# Altium PCB Zybo_Z7_Pcb.PcbDoc (part 6 of 8)
Units mm, origin at the board's own origin, x right, y up, seen from the top; angles counter-clockwise.
Board outline 122 x 88 mm, 8 copper layers (Top Layer, Layer 2, Layer 3, Layer 4, Layer 5, Layer 6, Layer 7, Bottom Layer), stack 1.625 mm thick; 658 components, 558 nets, 2538 pads, 924 vias.
Unrouted connection lines stored in the file: 1229.
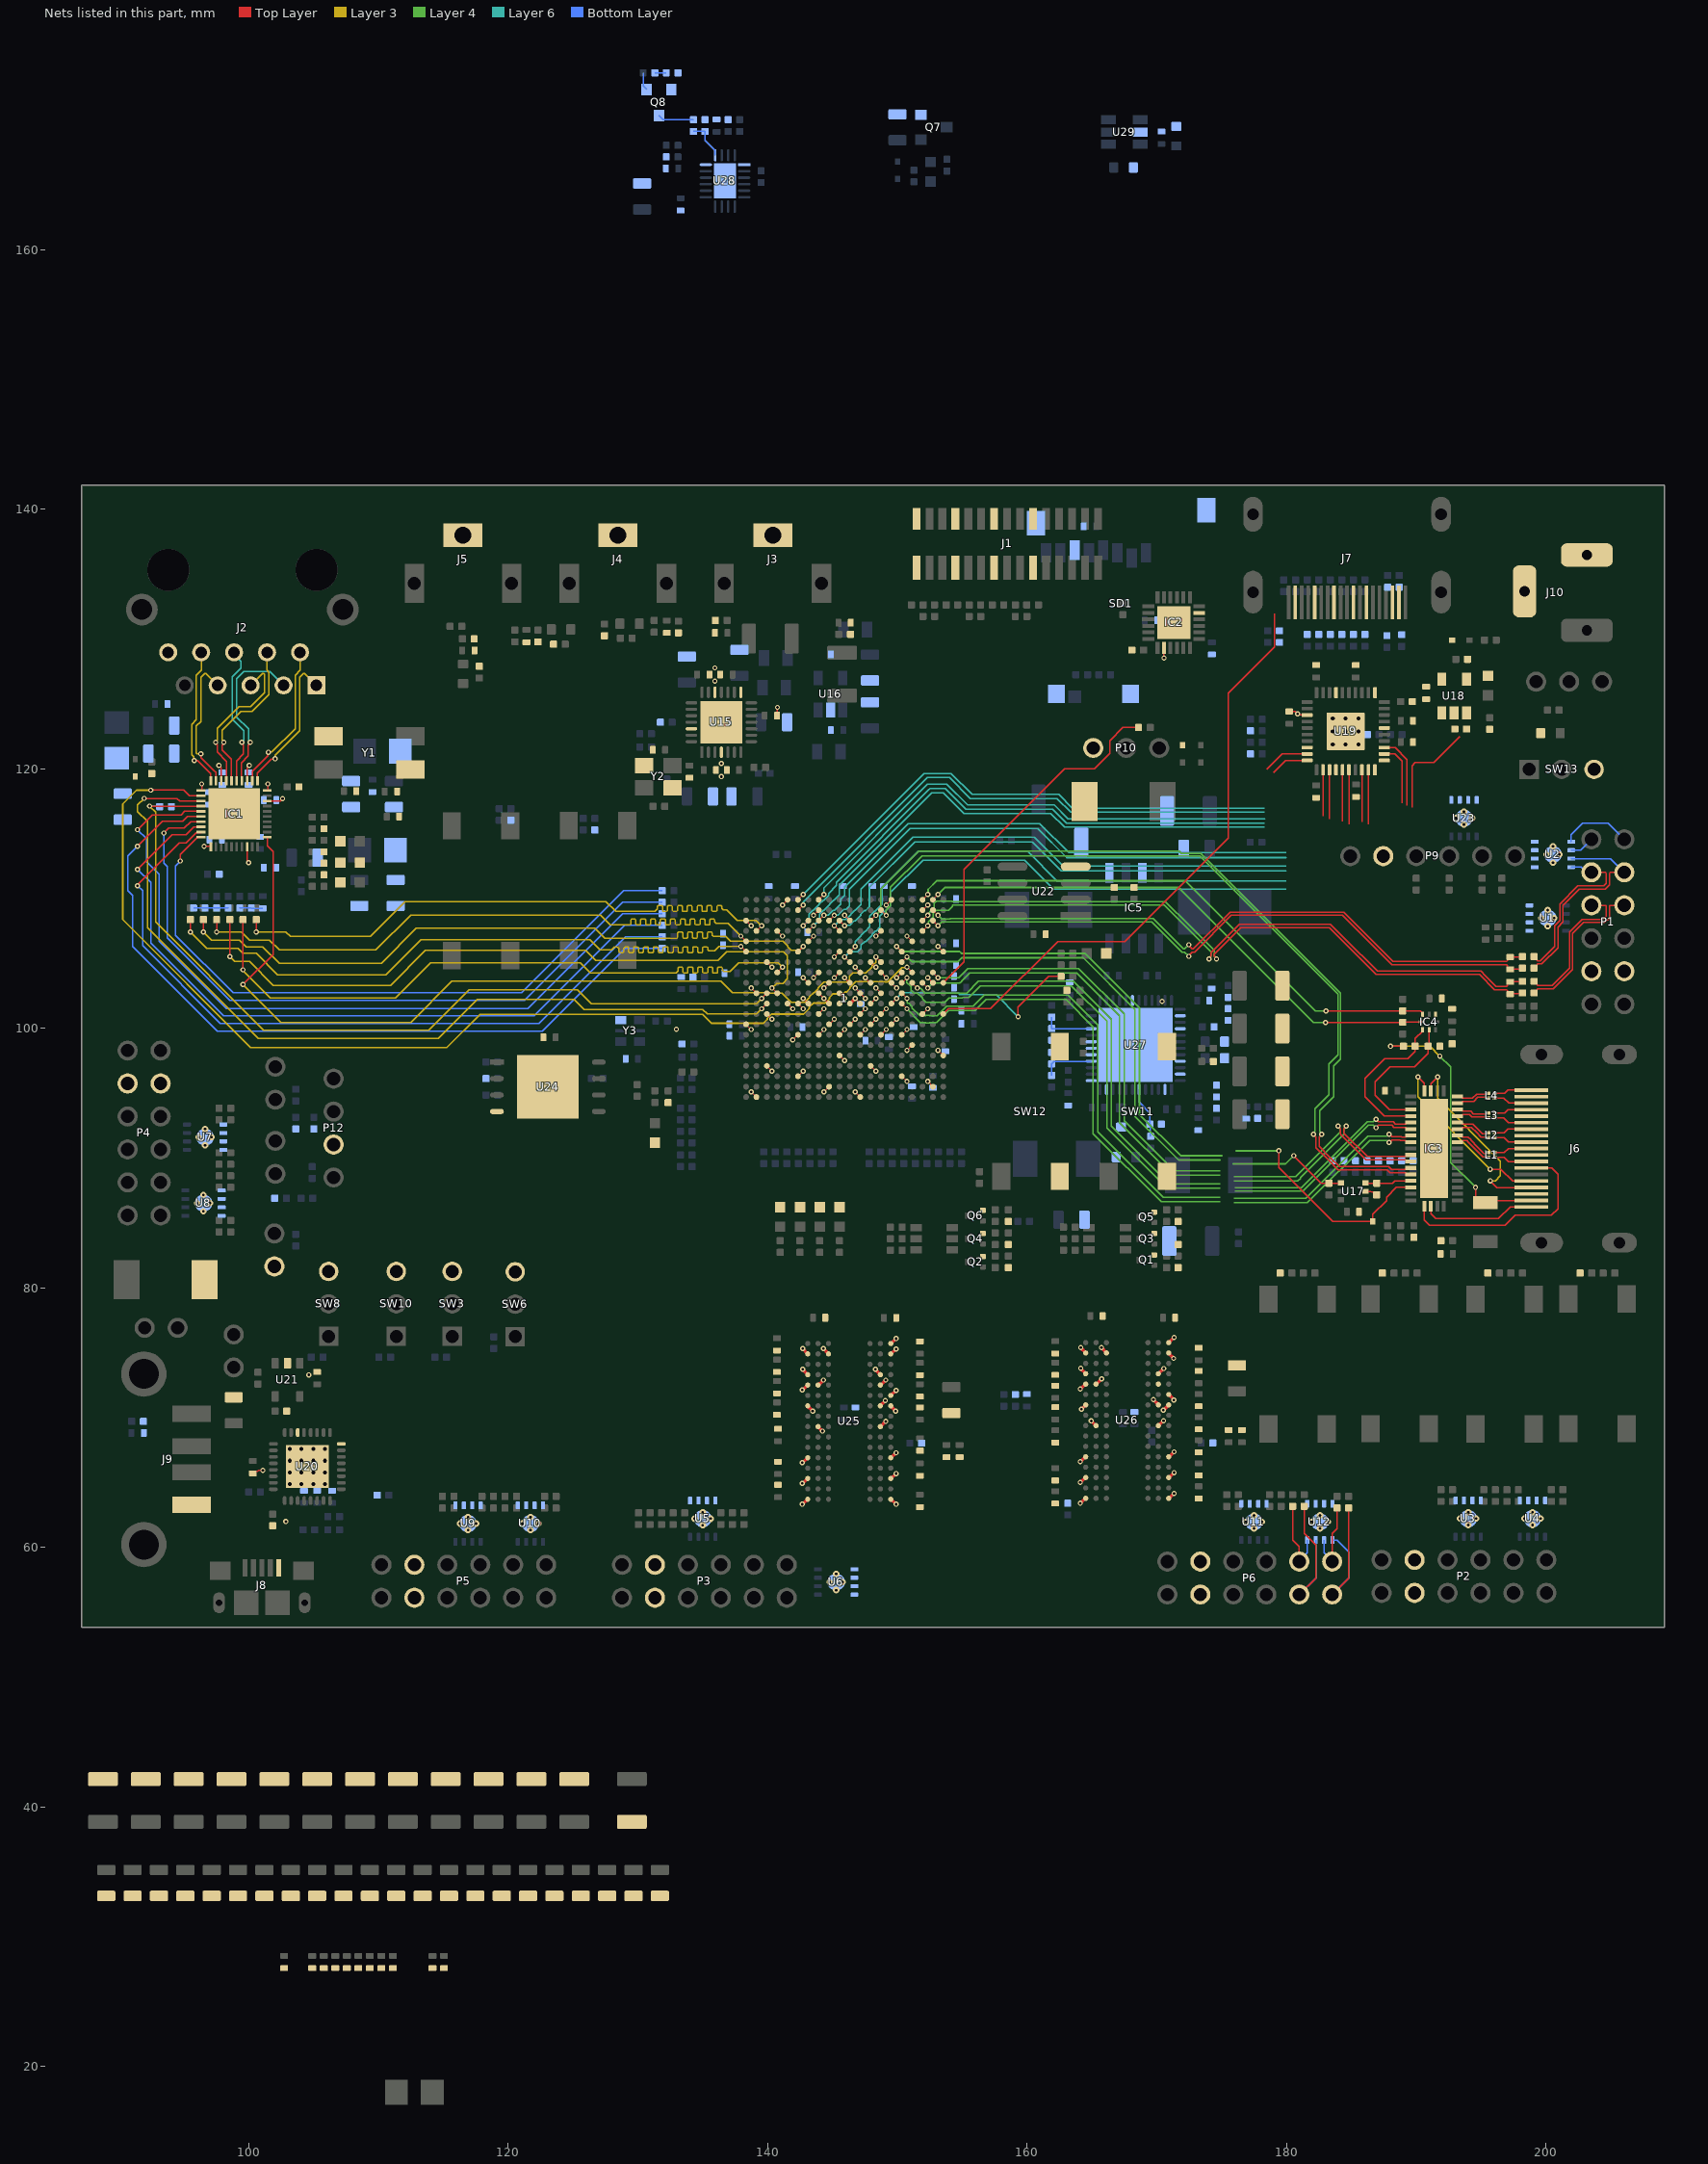
[diagram p11: the nets of this part, all layers, seen from the top]

## Via types
v1: diameter 0.4, hole 0.2, Top Layer to Bottom Layer, 249 vias
v2: diameter 0.4/0.2/0.2/0.2/0.2/0.2/0.2/0.2 (per signal layer), hole 0.2, Top Layer to Bottom Layer, 148 vias
v3: diameter 0.4/0.2/0.4/0.2/0.2/0.2/0.2/0.2 (per signal layer), hole 0.2, Top Layer to Bottom Layer, 136 vias
v4: diameter 0.4/0.2/0.2/0.4/0.2/0.2/0.2/0.2 (per signal layer), hole 0.2, Top Layer to Bottom Layer, 98 vias
v5: diameter 0.4/0.2/0.2/0.2/0.2/0.4/0.2/0.2 (per signal layer), hole 0.2, Top Layer to Bottom Layer, 68 vias
v6: diameter 0.4/0.4/0.2/0.2/0.4/0.2/0.4/0.4 (per signal layer), hole 0.2, Top Layer to Bottom Layer, 62 vias
v7: diameter 0.5, hole 0.2, Top Layer to Bottom Layer, 52 vias
v8: diameter 0.4/0.2/0.2/0.2/0.2/0.2/0.2/0.4 (per signal layer), hole 0.2, Top Layer to Bottom Layer, 31 vias
v9: diameter 0.5, hole 0.3, Top Layer to Bottom Layer, 25 vias
v10: diameter 0.4/0.4/0.2/0.2/0.4/0.4/0.4/0.4 (per signal layer), hole 0.2, Top Layer to Bottom Layer, 20 vias
v11: diameter 0.2/0.2/0.2/0.4/0.2/0.2/0.2/0.4 (per signal layer), hole 0.2, Top Layer to Bottom Layer, 15 vias
v12: diameter 0.2/0.2/0.2/0.2/0.2/0.4/0.2/0.4 (per signal layer), hole 0.2, Top Layer to Bottom Layer, 11 vias
v13: diameter 0.4/0.4/0.4/0.4/0.4/0.4/0.4/0.4 (per signal layer), hole 0.2, Top Layer to Bottom Layer, 5 vias
v14: diameter 0.4/0.2/0.2/0.2/0.2/0.4/0.2/0.4 (per signal layer), hole 0.2, Top Layer to Bottom Layer, 2 vias
v15: diameter 0.2/0.4/0.4/0.4/0.4/0.4/0.4/0.4 (per signal layer), hole 0.2, Top Layer to Bottom Layer, 2 vias

## Nets (pads, with @x,y where several pads share a name; then routed paths per layer and width w, separated by ;. In a path a pad name is that pad's centre, name@x,y a point inside that pad or via, vN(x,y) a via of type N, cw(c..) or ccw(c..) an arc to the next point about the centre after c; other vN are vias at no path point) (continued)
ESD_U12_1: P6.7 R28.1 U12.1 | length 12.6
  Top Layer w0.1: P6.7@183.515,56.388 184.785,57.658 R28.1@184.785,63.05
  Bottom Layer w0.1: P6.7@183.515,56.388 184.785,57.658 184.785,59.69 183.896,60.579 U12.1@183.545,60.579
ESD_U12_2: P6.1 R27.2 U12.2 | length 6.2
  Top Layer w0.1: P6.1@183.515,58.928 183.515,61.087 183.896,61.468 R27.2@183.896,63.05
  Bottom Layer w0.1: U12.2@182.895,60.579 182.895,59.616 183.515,58.996 P6.1@183.515,58.928
ESD_U12_3: P6.8 R32.1 U12.3 | length 12.4
  Top Layer w0.1: P6.8@180.975,56.388 182.245,57.658 182.245,60.198 181.356,61.087 R32.1@181.356,63.177
  Bottom Layer w0.1: P6.8@180.975,56.388 182.245,57.658 U12.3@182.245,60.579
ESD_U12_4: P6.2 R31.2 U12.4 | length 6.4
  Top Layer w0.1: R31.2@180.467,63.177 180.467,60.579 180.975,60.071 P6.2@180.975,58.928
  Bottom Layer w0.1: P6.2@180.975,58.928 180.975,58.996 181.595,59.616 U12.4@181.595,60.579
ETH_AVDD3V3: C17.2 C18.2 FB1.2 IC1.11 IC1.40 | length 0.9
  Top Layer w0.1: IC1.11@96.388,118.385 v1(96.388,118.847) ; IC1.40@101.488,118.385 v1(101.488,118.847)
ETH_INT_PU_B: 1.P14 IC1.31 | length 67
  Top Layer w0.05: v3(148.342,105.518) 1.P14@148.742,105.118
  Top Layer w0.1: v1(99.568,103.378) 101.892,105.702 101.892,113.627 101.432,114.087 IC1.31@101.432,114.735
  Layer 3 w0.1: v1(99.568,103.378) 102.489,100.457 112.497,100.457 115.672,103.632 136.398,103.632 137.287,102.743 140.145,102.743 140.176,102.711 141.129,102.711 141.826,102.014 142.859,102.014 143.241,102.396 143.241,102.445 143.551,102.754 143.6,102.754 143.91,103.064 143.91,103.113 144.354,103.557 146.102,103.557 146.304,103.759 146.304,104.013 146.558,104.267 147.574,104.267 148.043,104.736 148.043,104.839 148.219,105.014 148.283,105.014 148.342,105.073 v3@148.342,105.511
ETH_LD0: DS7.2 R109.2
ETH_LD1: DS6.1 R110.2
ETH_LD2: DS8.2 R111.2
ETH_MDC: 1.C10 IC1.13 | length 68.3
  Top Layer w0.05: v3(139.542,101.518) 1.C10@139.942,101.918
  Top Layer w0.1: v1(91.948,117.729) 94.488,117.729 94.682,117.535 IC1.13@96.332,117.535
  Layer 3 w0.1: v1(91.948,117.729) 91.44,117.221 91.44,116.713 92.202,115.951 92.202,107.761 100.726,99.238 114.638,99.238 117.635,102.235 125.095,102.235 125.857,101.473 134.995,101.473 135.357,101.111 139.142,101.111 v3@139.549,101.518
ETH_MDIO: 1.C11 IC1.14 R108.1 | length 66.5
  Top Layer w0.05: v3(139.542,102.318) 1.C11@139.942,102.718
  Top Layer w0.1: v1(92.37,117.135) IC1.14@96.332,117.135
  Layer 3 w0.1: v1(92.37,117.135) 92.837,116.668 92.837,108.204 101.168,99.873 113.868,99.873 116.992,102.997 125.349,102.997 126.435,101.911 139.142,101.911 v3@139.549,102.318
  Bottom Layer w0.1: v1(92.37,117.135) 93.108,117.135 R108.1@93.149,117.094
ETH_RST_B: 1.U13 C1.2 D1.2 IC1.12 R90.1 | length 84
  Top Layer w0.05: v3(150.742,104.718) 1.U13@151.142,104.318
  Top Layer w0.1: v1(92.456,118.364) 94.996,118.364 95.425,117.935 IC1.12@96.332,117.935
  Layer 3 w0.131: v1(92.456,118.364) 91.357,118.364 90.297,117.304 90.297,108.391 100.161,98.527 115.271,98.527 117.837,101.092 125.222,101.092 135.001,101.092 135.697,100.396 139.673,100.396 139.981,100.704 139.981,100.798 140.289,101.106 142.781,101.106 143.212,101.537 143.212,101.631 143.55,101.97 144.445,101.97 144.765,102.29 144.765,102.382 145.056,102.673 145.853,102.673 145.986,102.806 146.072,102.806 146.341,103.075 146.341,103.169 146.61,103.438 146.618,103.438 146.786,103.606 149.005,103.606 149.012,103.599 149.264,103.599 150.345,104.68 150.711,104.68 v3@150.742,104.711
ETH_RXCK: 1.B17 R102.1 | length 47.8
  Top Layer w0.05: 1.B17@139.142,107.518 v3(139.542,107.918)
  Top Layer w0.1: v1(100.584,107.442) R102.1@100.584,108.389
  Layer 3 w0.1: v1(100.584,107.442) 102.87,107.442 103.226,107.086 109.372,107.086 112.059,109.773 127.539,109.773 128.295,109.017 131.327,109.017 131.521,109.211 131.521,109.415 131.58,109.474 131.844,109.474 131.902,109.415 131.902,109.075 131.961,109.017 132.225,109.017 132.283,109.075 132.283,109.415 132.342,109.474 132.606,109.474 132.664,109.415 132.664,109.075 132.723,109.017 132.987,109.017 133.045,109.075 133.045,109.415 133.104,109.474 133.368,109.474 133.426,109.415 133.426,109.075 133.485,109.017 133.749,109.017 133.807,109.075 133.807,109.415 133.866,109.474 134.13,109.474 134.188,109.415 134.188,109.075 134.247,109.017 134.511,109.017 134.569,109.075 134.569,109.415 134.628,109.474 134.892,109.474 134.95,109.415 134.95,109.075 135.009,109.017 135.273,109.017 135.331,109.075 135.331,109.415 135.39,109.474 135.654,109.474 135.712,109.415 135.712,109.075 135.771,109.017 136.035,109.017 136.093,109.075 136.093,109.415 136.152,109.474 136.416,109.474 136.474,109.415 136.474,109.245 136.576,109.144 136.855,109.144 137.668,108.331 139.122,108.331 v3@139.535,107.918
ETH_RXCTL: 1.D13 R101.1 | length 52.4
  Top Layer w0.05: 1.D13@140.742,104.318 v3(141.142,104.718)
  Top Layer w0.1: v1(99.568,104.521) R101.1@99.568,108.389
  Layer 3 w0.1: v1(99.568,104.521) 99.568,104.465 101.671,102.362 102.235,102.362 111.329,102.362 114.016,105.048 125.582,105.048 126.338,104.292 132.944,104.292 133.096,104.445 133.096,104.666 133.155,104.724 133.418,104.724 133.477,104.666 133.477,104.326 133.536,104.267 133.799,104.267 133.858,104.326 133.858,104.666 133.917,104.724 134.18,104.724 134.239,104.666 134.239,104.326 134.298,104.267 134.561,104.267 134.62,104.326 134.62,104.666 134.679,104.724 134.942,104.724 135.001,104.666 135.001,104.326 135.06,104.267 135.323,104.267 135.382,104.326 135.382,104.666 135.441,104.724 135.704,104.724 135.763,104.666 135.763,104.326 135.822,104.267 136.085,104.267 136.144,104.326 136.144,104.666 136.203,104.724 136.466,104.724 136.525,104.666 136.525,104.496 136.627,104.394 137.109,104.394 137.768,105.053 140.801,105.053 v3@141.135,104.718
ETH_RXD0: 1.D11 R93.1 | length 52.4
  Top Layer w0.05: v3(140.342,103.118) 1.D11@140.742,102.718
  Top Layer w0.1: v1(98.552,105.537) R93.1@98.552,108.389
  Layer 3 w0.1: v1(98.552,105.537) 98.933,105.156 100.076,105.156 101.905,103.327 110.929,103.327 113.616,106.014 125.982,106.014 126.738,105.258 136.195,105.258 136.849,105.911 141.226,105.911 141.535,105.602 141.535,103.82 141.196,103.481 140.712,103.481 v3@140.342,103.111
ETH_RXD1: 1.A16 R98.1 | length 51.2
  Top Layer w0.05: v3(137.942,107.118) 1.A16@138.342,106.718
  Top Layer w0.1: v1(97.536,107.442) R98.1@97.536,108.389
  Layer 3 w0.1: v1(97.536,107.442) 99.441,107.442 100.076,106.807 101.6,106.807 102.362,106.045 109.804,106.045 112.49,108.731 127.108,108.731 127.864,107.975 129.399,107.975 129.458,108.034 129.458,108.374 129.516,108.433 129.78,108.433 129.839,108.374 129.839,108.034 129.897,107.975 130.161,107.975 130.22,108.034 130.22,108.374 130.278,108.433 130.542,108.433 130.601,108.374 130.601,108.034 130.659,107.975 130.923,107.975 130.982,108.034 130.982,108.374 131.04,108.433 131.304,108.433 131.363,108.374 131.363,108.034 131.421,107.975 131.685,107.975 131.744,108.034 131.744,108.374 131.802,108.433 132.066,108.433 132.125,108.374 132.125,108.034 132.183,107.975 132.447,107.975 132.506,108.034 132.506,108.374 132.564,108.433 132.828,108.433 132.887,108.374 132.887,108.034 132.945,107.975 133.209,107.975 133.268,108.034 133.268,108.374 133.326,108.433 133.59,108.433 133.649,108.374 133.649,108.034 133.707,107.975 133.971,107.975 134.03,108.034 134.03,108.374 134.088,108.433 134.352,108.433 134.411,108.374 134.411,108.034 134.469,107.975 134.733,107.975 134.792,108.034 134.792,108.374 134.85,108.433 135.114,108.433 135.173,108.374 135.173,108.034 135.231,107.975 135.495,107.975 135.554,108.034 135.554,108.374 135.612,108.433 135.876,108.433 135.935,108.374 135.935,108.204 136.036,108.102 136.951,108.102 v3@137.942,107.111
ETH_RXD2: 1.F15 R99.1 | length 53.7
  Top Layer w0.05: 1.F15@142.342,105.918 v3(142.742,106.318)
  Top Layer w0.1: v1(96.52,107.442) R99.1@96.52,108.389
  Layer 3 w0.1: v1(96.52,107.442) 97.155,106.807 99.314,106.807 99.822,106.299 101.092,106.299 102.362,105.029 110.225,105.029 112.911,107.715 126.687,107.715 127.443,106.959 133.012,106.959 133.071,107.018 133.071,107.358 133.129,107.417 133.393,107.417 133.452,107.358 133.452,107.018 133.51,106.959 133.774,106.959 133.833,107.018 133.833,107.358 133.891,107.417 134.155,107.417 134.214,107.358 134.214,107.018 134.272,106.959 134.536,106.959 134.595,107.018 134.595,107.358 134.653,107.417 134.917,107.417 134.976,107.358 134.976,107.018 135.034,106.959 135.298,106.959 135.357,107.018 135.357,107.358 135.415,107.417 135.679,107.417 135.738,107.358 135.738,107.188 135.839,107.086 136.754,107.086 137.129,106.711 141.176,106.711 141.541,106.346 141.541,106.3 141.817,106.025 142.445,106.025 v3@142.735,106.315
ETH_RXD3: 1.A15 R100.1 | length 54.1
  Top Layer w0.05: v3(137.942,106.318) 1.A15@138.342,105.918
  Top Layer w0.1: v1(95.504,107.442) R100.1@95.504,108.389
  Layer 3 w0.1: v1(95.504,107.442) 96.774,106.172 99.187,106.172 99.568,105.791 100.584,105.791 102.235,104.14 110.593,104.14 113.279,106.826 126.319,106.826 127.075,106.07 127.973,106.07 128.202,106.299 128.408,106.299 128.524,106.183 128.524,105.958 128.64,105.842 128.846,105.842 128.905,105.9 128.905,106.181 129.023,106.299 129.227,106.299 129.286,106.24 129.286,105.9 129.345,105.842 129.608,105.842 129.667,105.9 129.667,106.24 129.726,106.299 129.989,106.299 130.048,106.24 130.048,105.9 130.107,105.842 130.37,105.842 130.429,105.9 130.429,106.24 130.488,106.299 130.751,106.299 130.81,106.24 130.81,105.9 130.869,105.842 131.132,105.842 131.191,105.9 131.191,106.24 131.25,106.299 131.513,106.299 131.572,106.24 131.572,105.9 131.631,105.842 131.894,105.842 131.953,105.9 131.953,106.24 132.012,106.299 132.275,106.299 132.334,106.24 132.334,105.9 132.393,105.842 132.656,105.842 132.715,105.9 132.715,106.24 132.774,106.299 133.037,106.299 133.096,106.24 133.096,105.9 133.155,105.842 133.418,105.842 133.477,105.9 133.477,106.24 133.536,106.299 133.799,106.299 133.858,106.24 133.858,105.9 133.917,105.842 134.18,105.842 134.239,105.9 134.239,106.24 134.298,106.299 134.561,106.299 134.62,106.24 134.62,105.9 134.679,105.842 134.942,105.842 135.001,105.9 135.001,106.24 135.06,106.299 135.323,106.299 135.382,106.24 135.382,106.07 135.484,105.969 135.915,105.969 136.258,106.311 v3@137.942,106.311
ETH_TD0_N: IC1.2 J2.2 | length 11.6
  Top Layer w0.1: IC1.2@100.282,119.085 100.305,119.108 100.305,119.815 101.502,121.012 101.502,121.263 v1(101.524,121.285)
  Layer 3 w0.1: v1(101.524,121.285) 101.542,121.304 101.8,121.304 103.587,123.091 103.587,127.215 103.982,127.609 103.982,128.962 J2.2@103.962,128.981
ETH_TD0_P: IC1.1 J2.1 | length 11.3
  Top Layer w0.1: IC1.1@100.682,119.085 100.659,119.108 100.659,119.668 101.752,120.762 102.016,120.762 v1(102.032,120.777)
  Layer 3 w0.1: v1(102.032,120.777) 102.05,120.796 102.05,121.053 103.941,122.944 103.941,127.068 104.232,127.359 104.315,127.359 J2.1@105.232,126.441
ETH_TD1_N: IC1.5 J2.6 | length 11.1
  Top Layer w0.1: IC1.5@99.082,119.085 99.082,120.621 99.606,121.145 99.606,121.852 99.492,121.966 v1(99.492,122.047)
  Layer 6 w0.1: J2.6@98.882,128.981 98.882,128.805 99.392,128.296 99.392,127.762 98.73,127.1 98.73,123.832 99.632,122.93 99.632,122.256 99.492,122.115 v1(99.492,122.047)
ETH_TD1_P: IC1.4 J2.3 | length 12.9
  Top Layer w0.1: IC1.4@99.482,119.085 99.436,119.131 99.436,120.475 99.96,120.999 99.96,121.838 100.127,122.005 v1(100.127,122.047)
  Layer 6 w0.1: v1(100.127,122.047) 100.127,122.115 99.986,122.256 99.986,123.077 99.084,123.979 99.084,126.953 99.642,127.512 101.622,127.512 J2.3@102.692,126.441
ETH_TD2_N: IC1.7 J2.5 | length 12.1
  Top Layer w0.1: v1(97.46,122.047) 97.46,121.966 97.572,121.854 97.572,121.293 98.282,120.583 IC1.7@98.282,119.085
  Layer 3 w0.1: v1(97.46,122.047) 97.46,122.115 97.6,122.256 97.6,123.145 99.244,124.788 100.133,124.788 101.211,125.867 101.211,127.3 101.152,127.359 101.07,127.359 J2.5@100.152,126.441
ETH_TD2_P: IC1.6 J2.4 | length 12.4
  Top Layer w0.1: v1(98.095,122.047) 98.095,121.966 97.972,121.843 97.972,121.459 98.682,120.748 IC1.6@98.682,119.085
  Layer 3 w0.1: v1(98.095,122.047) 98.095,122.115 97.954,122.256 97.954,122.998 99.39,124.434 100.279,124.434 101.565,125.72 101.565,127.447 101.403,127.609 101.403,128.962 J2.4@101.422,128.981
ETH_TD3_N: IC1.10 J2.8 | length 11
  Top Layer w0.1: v1(95.809,120.65) 95.83,120.629 96.083,120.629 97.082,119.629 IC1.10@97.082,119.085
  Layer 3 w0.1: v1(95.809,120.65) 95.79,120.669 95.79,120.926 95.613,121.104 95.613,123.444 95.967,123.798 95.967,127.215 96.362,127.609 96.362,128.962 J2.8@96.342,128.981
ETH_TD3_P: IC1.9 J2.7 | length 10.7
  Top Layer w0.1: v1(96.317,121.158) 96.333,121.142 96.333,120.879 97.374,119.838 97.378,119.838 97.482,119.734 IC1.9@97.482,119.085
  Layer 3 w0.1: v1(96.317,121.158) 96.298,121.177 96.04,121.177 95.967,121.25 95.967,123.297 96.321,123.651 96.321,127.068 96.612,127.359 96.695,127.359 J2.7@97.612,126.441
ETH_TXCK: IC1.20 R207.1 | length 51.1
  Top Layer w0.1: v1(94.742,112.903) 94.742,113.395 96.082,114.735 IC1.20@96.332,114.735
  Bottom Layer w0.1: v1(94.742,112.903) 94.361,112.522 94.361,107.188 98.806,102.743 121.031,102.743 128.905,110.617 R207.1@131.884,110.617
ETH_TXCTL: IC1.19 R216.1 | length 56.7
  Top Layer w0.1: v1(91.44,110.998) 91.44,111.074 94.666,114.3 95.164,114.3 95.949,115.085 96.282,115.085 IC1.19@96.332,115.135
  Bottom Layer w0.1: v1(91.44,110.998) 91.821,110.617 91.821,106.387 97.828,100.381 122.377,100.381 129.057,107.061 R216.1@131.884,107.061
ETH_TXD0: IC1.18 R208.1 | length 57
  Top Layer w0.1: v1(91.44,112.268) 94.107,114.935 95.174,114.935 95.774,115.535 IC1.18@96.332,115.535
  Bottom Layer w0.1: v1(91.44,112.268) 92.456,111.252 92.456,106.579 98.07,100.965 121.996,100.965 128.981,107.95 R208.1@131.884,107.95
ETH_TXD1: IC1.17 R210.1 | length 54.7
  Top Layer w0.1: v1(93.472,115.062) 93.853,115.443 95.047,115.443 95.539,115.935 IC1.17@96.332,115.935
  Bottom Layer w0.1: v1(93.472,115.062) 93.472,112.74 93.726,112.486 93.726,106.997 98.564,102.159 121.26,102.159 128.829,109.728 R210.1@131.884,109.728
ETH_TXD2: IC1.16 R212.1 | length 60.2
  Top Layer w0.1: v1(91.44,114.046) 93.345,115.951 94.92,115.951 95.304,116.335 IC1.16@96.332,116.335
  Bottom Layer w0.1: v1(91.44,114.046) 90.678,113.284 90.678,110.617 91.059,110.236 91.059,106.323 97.586,99.797 122.631,99.797 129.007,106.172 R212.1@131.884,106.172
ETH_TXD3: IC1.15 R214.1 | length 58.7
  Top Layer w0.1: v1(91.44,115.316) 92.583,116.459 94.793,116.459 95.069,116.735 IC1.15@96.332,116.735
  Bottom Layer w0.1: v1(91.44,115.316) 92.126,114.63 92.126,112.852 93.091,111.887 93.091,106.734 98.301,101.524 121.514,101.524 128.829,108.839 R214.1@131.884,108.839
ETH_VCC1V0: C4.2 C5.2 C6.2 C7.2 C9.2 FB8.2 IC1.3 IC1.8 IC1.21 IC1.38 | length 4.3
  Top Layer w0.1: v1(96.571,114.046) 97.032,114.046 97.082,113.996 IC1.21@97.082,113.985 ; v1(97.714,120.269) 97.882,120.101 IC1.8@97.882,119.085 ; IC1.3@99.882,119.085 99.882,120.101 v1(100.051,120.269) ; IC1.38@101.432,117.535 102.448,117.535 v1(102.616,117.704)
ETH_VCC1V8: C25.2 C26.2 FB2.2 IC1.28 R94.2 R95.2 R96.2 R97.2 R108.2 | length 3.9
  Top Layer w0.1: IC1.28@99.882,113.985 99.882,112.975 100,112.857 v1(100,112.776)
  Bottom Layer w0.1: R97.2@95.758,109.278 R94.2@98.425,109.278
FAN_FB_PU: 1.Y12 R206.1 | length 28
  Top Layer w0.1: 1.Y12@153.54,103.52 155.143,105.123 155.143,112.268 155.696,112.821 162.89,120.015 165.189,120.015 166.37,121.196 166.37,122.174 167.386,123.19 R206.1@168.587,123.19
FB1: R274.1 R276.1 U27.40
FB2: R286.1 R288.1 U27.21 | length 3.9
  Bottom Layer w0.1: R286.1@161.9,100.878 R288.1@161.9,100 161.92,99.98 U27.21@164.949,99.98
FB3: R291.1 R292.1 U27.45
FB4: R297.1 R298.1 U27.16 | length 4
  Bottom Layer w0.1: R297.1@161.9,96.386 R298.1@161.9,97.264 162.088,97.453 164.921,97.453 U27.16@164.949,97.48
FB5: R299.1 R300.1 U27.6 | length 4
  Bottom Layer w0.1: U27.6@168.627,95.302 168.627,94.319 169.451,93.495 R300.1@169.451,92.634 169.485,92.599 169.485,91.721 R299.1@169.52,91.687
GND: 1.A8 1.A18 1.B1 1.B11 1.C4 1.C9 1.C14 1.D17 1.E10 1.E20 1.F3 1.F7 1.F10 1.G10 1.G12 1.G16 1.H7 1.H9 1.H11 1.H13 1.H19 1.J2 1.J8 1.J10 1.J12 1.K5 1.K7 1.K10 1.K11 1.K13 1.K15 1.L8 1.L10 1.L12 1.L18 1.M1 1.M7 1.M9 1.M10 1.M11 1.M13 1.N4 1.N8 1.N10 1.N12 1.N14 1.P7 1.P9 1.P11 1.P13 1.P17 1.R8 1.R12 1.R20 1.T3 1.T7 1.T13 1.U6 1.U16 1.V9 1.V19 1.W2 1.W12 1.Y5 1.Y15 C1.1 C2.1 C3.1 C4.1 C5.1 C6.1 C7.1 C8.1 C9.1 C11.1 C12.1 C13.1 C14.1 C15.1 C16.1 C17.1 C18.1 C19.1 C20.1 C21.1 C23.1 C24.1 C25.1 C26.1 C27.1 C28.1 C29.1 C30.1 C32.1 C33.1 C34.1 C35.1 C37.1 C38.1 C40.1 C42.1 C43.1 C45.1 C46.1 C47.1 C48.1 C49.1 C50.1 C51.1 C52.1 C53.1 C54.1 C55.1 C56.1 C57.1 C58.1 C59.1 C60.1 C61.1 C62.1 C63.1 C64.1 C65.1 C66.1 C67.1 C68.1 C69.1 C70.2 C71.1 C72.1 C73.1 C74.1 C75.1 C76.1 C77.1 C78.1 C79.1 C80.1 C81.1 C86.1 C87.1 C88.1 C89.1 C90.1 C91.1 C92.1 C93.2 C94.2 C95.2 C96.1 C97.1 C98.1 C99.1 C100.1 C101.1 C102.1 C103.1 C104.1 C105.1 C106.1 C107.2 C108.1 C109.1 C110.1 C111.2 C112.1 C113.1 C114.1 C115.1 C116.1 C117.1 C118.1 C119.1 C120.2 C121.1 C122.1 C123.1 C124.2 C125.1 C126.1 C127.1 C128.2 C129.1 C130.1 C131.1 C132.2 C133.1 C134.1 C135.1 C136.1 C137.1 C138.1 C139.1 C140.2 C141.1 C142.1 C143.1 C144.1 C145.1 C146.2 C147.1 C148.1 C149.1 C150.1 C151.1 C152.1 C153.1 C154.1 C155.2 C156.1 C157.1 C160.1 C161.1 C162.1 C163.1 C164.1 C165.1 C166.1 C167.1 C168.1 C169.1 C170.1 C171.1 C172.1 C173.1 C174.1 C175.1 C176.1 C177.1 C178.1 C179.1 C180.1 C181.1 C182.1 C183.1 C184.1 C185.1 C186.1 C187.1 C188.1 C189.1 C190.1 C191.1 C192.1 C193.1 C194.1 C195.1 C196.1 C197.1 C198.1 C199.1 C200.2 C201.2 C202.2 C203.2 C204.1 C205.1 C206.2 C207.1 C209.2 C210.1 C211.1 C212.2 C213.1 C214.2 C216.2 C217.2 C219.1 C220.2 C222.1 C223.1 C224.1 C225.1 C226.1 C227.1 C228.1 C229.1 C230.1 C231.1 C232.1 C233.1 D15.2 DS1.2 DS2.2 DS3.2 DS4.2 DS5.2 DS6.2 DS10.2 IC1.41 IC2.2 IC2.11 IC2.25 IC3.43 IC4.1 IC5.1 IC5.3 J1.1 J1.4 J1.7 J1.10 J2.10 J3.1 J4.1 J5.1 J6.2 J6.5 J6.8 J6.11 J6.17 J7.2 J7.5 J7.8 J7.11 J7.17 J8.5 J9.4 J10.2 J10.3 P1.5 P1.11 P2.5 P2.11 P3.5 P3.11 P4.5 P4.11 P5.5 P5.11 P6.5 P6.11 P9.5 P10.3 P12.2 P14.1 Q1.2 Q2.2 Q3.2 Q4.2 Q5.2 Q6.2 Q7.2 Q8.2 R44.1 R45.1 R66.2 R67.2 R68.2 R69.2 R83.1 R84.1 R85.1 R86.1 R87.1 R88.1 R103.1 R104.1 R105.1 R112.2 R113.2 R118.1 R121.2 R122.2 R126.2 R127.2 R130.2 R134.2 R135.2 R136.2 R137.2 R139.2 R140.2 R155.2 R157.1 R170.1 R171.1 R172.1 R173.1 R174.1 R191.2 R192.2 R193.1 R195.2 R239.2 R240.2 R245.1 R246.1 R247.2 R251.1 R256.2 R257.1 R268.1 R269.1 R270.1 R272.2 R274.2 R275.2 R279.2 R281.2 R285.2 R287.2 R288.2 R292.2 R298.2 R300.2 R303.1 R305.2 R308.1 R309.1 SD1.6 SD1.10 SD1.11 SD1.12 SD1.13 SW3.3 SW6.3 SW8.3 SW10.3 SW11.1 SW11.2 SW12.3 SW12.4 SW13.3 U1.5 U1.6 U1.7 U1.8 U1.9 U2.5 U2.6 U2.7 U2.8 U2.9 U3.5 U3.6 U3.7 U3.8 U3.9 U4.5 U4.6 U4.7 U4.8 U4.9 U5.5 U5.6 U5.7 U5.8 U5.9 U6.5 U6.6 U6.7 U6.8 U6.9 U7.5 U7.6 U7.7 U7.8 U7.9 U8.5 U8.6 U8.7 U8.8 U8.9 U9.5 U9.6 U9.7 U9.8 U9.9 U10.5 U10.6 U10.7 U10.8 U10.9 U11.5 U11.6 U11.7 U11.8 U11.9 U12.5 U12.6 U12.7 U12.8 U12.9 U15.4 U15.15 U15.19 U15.26 U15.29 U16.2 U17.2 U18.1 U18.3 U19.3 U19.8 U19.14 U19.20 U19.21 U19.26 U19.31 U19.37 U19.41 U20.8 U20.14 U20.33 U21.2 U22.4 U23.5 U23.6 U23.7 U23.8 U23.9 U24.4 U24.9 U25.A9 U25.B1 U25.B3 U25.B9 U25.D1 U25.D8 U25.E1 U25.E2 U25.E8 U25.F9 U25.G1 U25.G8 U25.G9 U25.J2 U25.J8 U25.M1 U25.M9 U25.P1 U25.P9 U25.T1 U25.T9 U26.A9 U26.B1 U26.B3 U26.B9 U26.D1 U26.D8 U26.E1 U26.E2 U26.E8 U26.F9 U26.G1 U26.G8 U26.G9 U26.J2 U26.J8 U26.M1 U26.M9 U26.P1 U26.P9 U26.T1 U26.T9 U27.2 U27.11 U27.13 U27.17 U27.18 U27.19 U27.30 U27.38 U27.47 U27.49 U28.1 U28.16 U28.21 U29.2 Y1.2 Y1.4 Y2.2 Y2.4 Y3.3 | length 65.9
  Top Layer w0.05: 1.A8@138.342,100.318 v2(138.742,99.918) ; 1.A18@138.342,108.318 v2(138.742,107.918) ; v2(138.742,95.118) 1.B1@139.142,94.718 ; v2(138.742,103.118) 1.B11@139.142,102.718 ; 1.C4@139.942,97.118 v2(140.342,96.718) ; 1.C9@139.942,101.118 v2(140.342,100.718) ; 1.C14@139.942,105.118 v2(140.342,104.718) ; 1.D17@140.742,107.518 v2(141.142,107.118) ; v2(141.142,109.518) 1.E20@141.542,109.918 ; 1.E10@141.542,101.918 v2(141.942,101.518) ; v2(141.942,99.118) 1.F7@142.342,99.518 ; 1.F3@142.342,96.318 v2(142.742,96.718) ; 1.F10@142.342,101.918 v2(142.742,101.518) ; v2(142.742,102.318) 1.G10@143.142,101.918 ; v2(142.742,103.918) 1.G12@143.142,103.518 ; 1.G16@143.142,106.718 v2(143.542,107.118) ; v2(143.542,103.918) 1.H13@143.942,104.318 ; v2(143.542,108.718) 1.H19@143.942,109.118 ; 1.H7@143.942,99.518 v2(144.342,99.918) ; 1.H9@143.942,101.118 v2(144.342,101.518) ; 1.H11@143.942,102.718 v2(144.342,102.318) 1.J10@144.742,101.918 ; v2(144.342,95.118) 1.J2@144.742,95.518 ; v2(144.342,103.118) 1.J12@144.742,103.518 ; 1.J8@144.742,100.318 v2(145.142,100.718) ; v2(145.142,103.918) 1.K13@145.542,104.318 ; v2(145.142,105.518) 1.K15@145.542,105.918 ; 1.K5@145.542,97.918 v2(145.942,97.518) ; 1.K7@145.542,99.518 v2(145.942,99.918) ; 1.K10@145.542,101.918 v2(145.942,102.318) 1.K11@145.542,102.718 ; v2(145.942,103.918) 1.L12@146.342,103.518 ; v2(145.942,108.718) 1.L18@146.342,108.318 ; 1.L8@146.342,100.318 v2(146.742,100.718) ; v2(146.742,95.118) 1.M1@147.142,94.718 ; v2@146.742,102.318 1.M10@147.142,101.918 ; v2(146.742,103.118) 1.M11@147.142,102.718 v2(147.542,102.318) ; v2(146.742,104.718) 1.M13@147.142,104.318 ; 1.M7@147.142,99.518 v2(147.542,99.918) ; 1.M9@147.142,101.118 v2(147.542,101.518) ; v2(147.542,103.918) 1.N12@147.942,103.518 ; 1.N4@147.942,97.118 v2(148.342,96.718) ; 1.N8@147.942,100.318 v2(148.342,100.718) ; 1.N10@147.942,101.918 v2(148.342,102.318) ; 1.N14@147.942,105.118 v2(148.342,104.718) ; v2(148.342,103.118) 1.P11@148.742,102.718 ; v2(148.342,107.118) 1.P17@148.742,107.518 ; 1.P7@148.742,99.518 v2(149.142,99.918) ; 1.P9@148.742,101.118 v2(149.142,101.518) ; 1.P13@148.742,104.318 v2(149.142,103.918) ; v2(149.142,109.518) 1.R20@149.542,109.918 ; 1.R8@149.542,100.318 v2(149.942,100.718) ; 1.R12@149.542,103.518 v2(149.942,103.118) ; v2(149.942,103.918) 1.T13@150.342,104.318 ; 1.T3@150.342,96.318 v2(150.742,95.918) ; 1.T7@150.342,99.518 v2(150.742,99.918) ; v2(150.742,98.318) 1.U6@151.142,98.718 ; v2(150.742,107.118) 1.U16@151.142,106.718 ; 1.V9@151.942,101.118 v2(152.342,101.518) ; 1.V19@151.942,109.118 v2(152.342,109.518) ; v2(152.342,95.918) 1.W2@152.742,95.518 ; v2(152.342,103.918) 1.W12@152.742,103.518 ; v2(153.142,98.318) 1.Y5@153.542,97.918 ; v2(153.142,106.318) 1.Y15@153.542,105.918
  Top Layer w0.1: C71.1@100.331,65.723 100.502,65.894 100.693,65.894 100.743,65.944 v1(101.093,65.944) ; C30.1@140.724,124.104 140.757,124.137 v1(140.757,124.739) ; v1(170.553,128.556) IC2.2@170.553,129.323 ; C59.1@180.213,124.427 180.651,124.427 180.846,124.232 v1(180.848,124.232) 180.928,124.151 U19.3@181.585,124.151 ; U17.2@186.091,87.452 186.491,87.452 186.549,87.393 186.731,87.393 R139.2@186.944,87.18
  Top Layer w0.254: v6@142.693,63.342 U25.T1@143.075,63.724 ; v6@142.693,64.942 U25.P1@143.075,65.324 ; v6@142.693,66.542 U25.M1@143.075,66.924 ; v6@142.693,72.142 U25.E1@143.075,72.524 ; v6@142.712,73.724 U25.D1@143.094,73.342 ; v6@142.712,75.324 U25.B1@143.094,74.942 ; U25.G1@143.094,70.905 v6@143.475,70.523 ; U25.B1@143.094,74.924 U25.B1@143.112,74.924 ; U25.J2@143.894,69.305 144.225,68.974 v6(144.227,68.974) ; U25.E2@143.912,72.524 v6@144.294,72.905 ; v10@144.312,75.324 U25.B3@144.694,74.942 ; 1.L10@146.342,101.918 v2(146.744,102.319) ; v10@148.312,73.724 U25.D8@148.694,73.342 ; U25.G8@148.694,70.942 v6@149.075,71.324 ; U25.J8@148.712,69.342 v6@149.094,69.724 ; U25.E8@148.712,72.524 v6@149.094,72.905 ; U25.G9@149.494,70.905 v6@149.875,70.523 ; U25.T9@149.512,63.724 v6@149.894,63.342 ; U25.P9@149.512,65.324 v6@149.894,65.705 ; U25.M9@149.512,66.924 v6@149.894,67.305 ; U25.F9@149.512,71.724 v6@149.894,72.105 ; U25.B9@149.512,74.924 v10@149.894,75.305 ; U25.A9@149.512,75.724 v10@149.894,76.105 ; v6@164.116,63.414 U26.T1@164.498,63.796 ; v6@164.116,65.014 U26.P1@164.498,65.396 ; v6@164.116,66.614 U26.M1@164.498,66.996 ; v6@164.116,72.214 U26.E1@164.498,72.596 ; v6@164.135,73.796 U26.D1@164.516,73.415 ; v6@164.135,75.396 U26.B1@164.516,75.015 ; v6(164.198,70.66) 164.498,70.959 U26.G1@164.498,70.977 ; U26.B1@164.516,74.996 U26.B1@164.535,74.996 ; v6(164.945,69.759) 165.29,69.415 U26.J2@165.316,69.415 ; U26.E2@165.316,72.596 165.333,72.596 165.739,73.002 v10(165.755,73.002) ; v6@165.735,75.396 U26.B3@166.116,75.015 ; v6(169.735,71.396) U26.G8@170.116,71.015 ; U26.J8@170.116,69.396 v6@170.498,69.777 ; U26.D8@170.135,73.415 v10@170.516,73.796 ; v6@170.516,70.596 U26.G9@170.898,70.977 ; U26.B9@170.916,74.977 v6@171.298,74.596 ; U26.T9@170.935,63.796 v6@171.317,64.177 ; U26.P9@170.935,65.396 v6@171.317,65.777 ; U26.M9@170.935,66.996 v6@171.317,67.377 ; U26.F9@170.935,71.777 v10@171.317,71.396 ; U26.A9@170.935,75.815 v10@171.317,76.196
  Bottom Layer w0.1: R103.1@99.314,109.278 R104.1@100.203,109.278 100.228,109.253 C11.1@101.092,109.253
  other v1: 102.871,62.007 104.649,73.31 132.969,99.949 170.409,102.083 136.439,119.405 136.439,120.421 135.939,126.771 135.939,127.787
  other v6: 142.675,63.342 149.913,63.342 164.097,63.414 171.335,64.177 142.675,64.942 164.097,65.014 149.913,65.705 171.335,65.777 142.675,66.542 164.097,66.614 149.913,67.305 171.335,67.377 149.113,69.724 170.516,69.777 143.475,70.505 149.875,70.505 170.497,70.596 149.075,71.343 149.913,72.105 142.675,72.142 164.097,72.214 144.313,72.905 149.113,72.905 142.712,73.743 164.135,73.815 171.298,74.577 142.712,75.343 164.135,75.415 165.735,75.415
  other v7: 145.285,56.723 144.785,57.348 145.785,57.348 145.285,57.973 116.911,61.352 121.722,61.352 177.49,61.479 182.57,61.479 135.001,61.73 194,61.733 198.953,61.733 116.286,61.852 117.536,61.852 121.097,61.852 122.347,61.852 176.865,61.979 178.115,61.979 181.945,61.979 183.195,61.979 134.376,62.23 135.626,62.23 193.375,62.233 194.625,62.233 198.328,62.233 199.578,62.233 116.911,62.352 121.722,62.352 177.49,62.479 182.57,62.479 135.001,62.73 194,62.733 198.953,62.733 96.523,85.918 96.023,86.543 97.023,86.543 96.523,87.168 96.65,90.998 96.15,91.623 97.15,91.623 96.65,92.248 200.124,107.879 199.624,108.504 200.624,108.504 200.124,109.129 200.533,112.786 200.033,113.411 201.033,113.411 200.533,114.036 193.675,115.705 193.05,116.205 194.3,116.205 193.675,116.705
  other v9: 103.176,64.895 104.076,64.895 104.976,64.895 105.876,64.895 103.176,65.795 104.076,65.795 104.976,65.795 105.876,65.795 103.176,66.695 104.076,66.695 104.976,66.695 105.876,66.695 103.176,67.595 104.076,67.595 104.976,67.595 105.876,67.595 183.56,121.901 184.56,121.901 185.56,121.901 183.56,122.901 184.56,122.901 185.56,122.901 183.56,123.901 184.56,123.901 185.56,123.901
  other v10: 171.317,71.377 148.312,73.743 170.535,73.796 149.913,75.305 144.312,75.343 149.913,76.105 171.335,76.196
HDMI_RX0_N: 1.G18 R161.1 U19.16 | length 46.3
  Top Layer w0.05: v5(142.742,107.918) 1.G18@143.142,108.318
  Top Layer w0.1: 184.81,115.751 U19.16@184.81,119.926
  Layer 6 w0.1: v5(142.742,107.918) 143.189,108.365 143.189,108.79 143.491,109.092 143.54,109.092 143.979,109.531 143.979,109.579 144.286,109.886 144.335,109.886 144.697,110.249 144.697,110.407 145.305,111.015 145.305,111.269 152.435,118.399 152.53,118.494 153.68,118.494 155.281,116.894 161.961,116.894 163.028,115.827 165.263,115.827 165.735,115.827 178.308,115.827
HDMI_RX0_P: 1.G17 R160.1 U19.15 | length 45.4
  Top Layer w0.05: 1.G17@143.142,107.518 v5(143.542,107.918)
  Top Layer w0.1: 184.31,115.958 U19.15@184.31,119.926
  Layer 6 w0.1: v5(143.542,107.918) 143.989,108.365 143.989,108.79 144.291,109.092 144.34,109.092 144.779,109.531 144.779,109.579 145.086,109.886 145.135,109.886 145.542,110.294 145.542,111.049 152.664,118.171 153.547,118.171 155.147,116.571 161.827,116.571 162.894,115.504 165.129,115.504 165.735,115.504 178.308,115.504
HDMI_RX1_N: 1.F20 R163.1 U19.13 | length 44.9
  Top Layer w0.05: 1.F20@142.342,109.918 v5(142.742,110.318)
  Top Layer w0.1: 183.31,116.156 U19.13@183.31,119.926
  Layer 6 w0.1: v5(142.742,110.318) 152.058,119.634 154.153,119.634 155.753,118.034 162.433,118.034 163.5,116.967 178.308,116.967
HDMI_RX1_P: 1.F19 R162.1 U19.12 | length 45
  Top Layer w0.05: 1.F19@142.342,109.118 v5(142.742,109.518)
  Top Layer w0.1: 182.81,116.363 U19.12@182.81,119.926
  Layer 6 w0.1: v5(142.742,109.518) 142.742,109.74 152.331,119.329 154.026,119.329 155.627,117.729 162.307,117.729 163.374,116.662 165.609,116.662 165.735,116.662 178.308,116.662
HDMI_RX2_N: 1.H18 R165.1 U19.10 | length 43.6
  Top Layer w0.05: 1.H18@143.942,108.318 v5(144.342,108.718)
  Top Layer w0.1: 178.997,119.717 179.931,120.651 U19.10@181.585,120.651
  Layer 6 w0.1: v5@144.335,108.718 144.659,108.718 145.039,109.098 145.153,109.098 145.643,109.588 145.643,109.963 145.923,110.243 145.923,110.871 150.825,115.773 160.974,115.773 163.209,113.538 179.959,113.538
HDMI_RX2_P: 1.J18 R164.1 U19.9 | length 43.4
  Top Layer w0.05: 1.J18@144.742,108.318 v5(145.142,108.718)
  Top Layer w0.1: 178.489,119.971 179.669,121.151 U19.9@181.585,121.151
  Layer 6 w0.131: v5@145.135,108.718 145.146,108.729 145.432,108.729 145.878,109.175 146.05,109.175 146.304,109.429 146.304,110.729 150.978,115.404 160.821,115.404 163.056,113.169 179.959,113.169
HDMI_RX_5V0: C65.2 J7.18 R185.2 R186.2 U18.5
HDMI_RX_CEC: 1.Y9 D12.1 J7.13 | length 46.3
  Top Layer w0.1: 1.Y9@153.542,101.118 153.942,101.518 157.195,101.518 162.382,106.705 167.538,106.705 175.514,114.681 175.514,125.85 179.07,129.406 179.07,131.953
HDMI_RX_CLK_N: 1.K18 R159.1 U19.19 | length 43.3
  Top Layer w0.05: 1.K18@145.542,108.318 v5(145.942,107.918)
  Top Layer w0.1: 186.31,115.727 U19.19@186.31,119.926
  Layer 6 w0.131: v5@145.942,107.925 145.971,107.954 146.339,107.954 146.663,108.278 146.755,108.278 147.171,108.694 147.171,108.787 147.471,109.087 147.55,109.087 147.851,109.387 147.851,110.879 151.348,114.376 160.395,114.376 162.631,112.141 179.959,112.141
HDMI_RX_CLK_P: 1.K17 R158.1 U19.18 | length 43.9
  Top Layer w0.05: v5(145.142,107.918) 1.K17@145.542,107.518
  Top Layer w0.1: U19.18@185.81,119.926 185.81,119.03 185.834,119.006 185.834,115.924
  Layer 6 w0.1: v5@145.142,107.911 145.614,108.384 146.027,108.384 146.426,108.782 146.426,108.819 146.713,109.107 146.748,109.107 147.193,109.551 147.193,110.744 151.195,114.746 160.549,114.746 162.784,112.511 179.959,112.511
HDMI_RX_HPD: 1.L15 R157.2 U18.2 | length 47.1
  Top Layer w0.05: 1.L15@146.342,105.918 v5(146.742,106.318)
  Top Layer w0.1: 189.665,117.05 189.665,120.225 189.919,120.479 191.345,120.479 193.37,122.504
  Layer 6 w0.1: v5@146.735,106.318 146.735,106.694 147.184,107.143 147.184,107.182 147.487,107.484 147.539,107.484 147.882,107.827 147.882,108.675 148.242,109.035 148.286,109.035 148.844,109.593 148.844,110.871 151.587,113.614 160.08,113.614 162.315,111.379 179.959,111.379
HDMI_RX_SCL: 1.L14 R183.1 U19.22 | length 44.8
  Top Layer w0.05: v5(145.942,105.518) 1.L14@146.342,105.118
  Top Layer w0.1: U19.22@187.535,121.151 188.358,121.151 188.903,120.606 188.903,117.366
  Layer 6 w0.1: v5@145.942,105.511 146.393,105.962 146.526,105.962 146.57,105.918 146.939,105.918 147.208,106.187 147.208,106.415 147.498,106.705 147.556,106.705 148.038,107.187 148.038,107.241 148.315,107.518 148.372,107.518 148.649,107.794 148.649,108.656 149.017,109.024 149.07,109.024 149.479,109.433 149.479,110.49 151.968,112.979 159.817,112.979 162.052,110.744 179.959,110.744
HDMI_RX_SDA: 1.H20 R184.1 U19.23 | length 45.1
  Top Layer w0.05: 1.H20@143.942,109.918 v5(144.342,110.318)
  Top Layer w0.1: U19.23@187.535,121.651 188.366,121.651 189.284,120.733 189.284,117.208
  Layer 6 w0.131: v5@144.335,110.318 144.335,110.825 152.331,118.821 153.816,118.821 155.416,117.221 162.096,117.221 163.163,116.154 165.398,116.154 165.735,116.154 178.308,116.154
HDMI_TX0_N: 1.W13 IC3.11 R143.2 | length 50.9
  Top Layer w0.05: 1.W13@152.742,104.318 v4(153.142,103.918)
  Top Layer w0.1: v1(183.972,92.481) 183.972,92.465 184.165,92.273 184.165,91.834 186.119,89.879 189.164,89.879 189.289,89.754 IC3.11@189.564,89.754
  Layer 4 w0.1: v4@153.142,103.925 154.728,103.925 155.431,104.627 156.263,104.627 156.269,104.621 163.98,104.621 167.486,101.115 167.486,92.889 171.342,89.034 174.868,89.034 ; 175.971,88.595 180.696,88.595 184.099,91.999 184.099,92.273 183.972,92.4 v1(183.972,92.481)
HDMI_TX0_P: 1.V12 IC3.10 R144.2 | length 52.1
  Top Layer w0.05: 1.V12@151.942,103.518 v4(152.342,103.118)
  Top Layer w0.1: v1(184.607,92.481) 184.607,92.465 184.415,92.273 184.415,91.937 186.223,90.129 189.164,90.129 189.289,90.254 IC3.10@189.564,90.254
  Layer 4 w0.1: v4@152.342,103.125 152.722,103.505 154.813,103.505 154.937,103.629 154.937,103.633 155.577,104.273 156.116,104.273 156.122,104.267 163.834,104.267 167.132,100.969 167.132,92.889 167.132,92.743 171.195,88.68 174.868,88.68 ; 175.971,88.241 180.869,88.241 181.077,88.449 181.077,88.501 184.467,91.891 184.467,92.273 184.607,92.413 v1(184.607,92.481)
HDMI_TX1_N: 1.T10 IC3.8 R145.2 | length 53
  Top Layer w0.05: 1.T10@150.342,101.918 v4(150.742,101.518)
  Top Layer w0.1: v1(187.909,91.211) 187.925,91.211 188.118,91.404 188.745,91.404 188.77,91.379 189.164,91.379 189.289,91.254 IC3.8@189.564,91.254
  Layer 4 w0.1: v4@150.742,101.525 150.742,101.487 151.772,100.457 152.172,100.457 152.211,100.418 152.46,100.418 152.499,100.457 153.035,100.457 153.953,101.375 155.978,101.375 156.838,102.235 162.992,102.235 165.1,100.127 165.1,91.901 170.353,86.648 174.868,86.648 ; 175.971,86.563 181.61,86.563 186.399,91.352 187.701,91.352 187.841,91.211 v1(187.909,91.211)
HDMI_TX1_P: 1.T11 IC3.7 R146.2 | length 53.3
  Top Layer w0.05: 1.T11@150.342,102.718 v4(150.742,102.318)
  Top Layer w0.1: v1(187.909,91.846) 187.925,91.846 188.118,91.654 188.849,91.654 188.874,91.629 189.164,91.629 189.289,91.754 IC3.7@189.564,91.754
  Layer 4 w0.1: v4@150.742,102.325 150.742,101.988 150.805,101.925 150.908,101.925 151.142,101.69 151.142,101.588 151.765,100.965 152.158,100.965 152.211,101.018 152.46,101.018 152.513,100.965 153.042,100.965 153.807,101.729 155.831,101.729 156.691,102.589 163.139,102.589 163.389,102.339 165.454,100.274 165.454,92.048 170.5,87.002 174.868,87.002 ; 175.971,86.917 181.464,86.917 186.252,91.706 187.701,91.706 187.841,91.846 v1(187.909,91.846)
HDMI_TX2_N: 1.U12 IC3.6 R147.2 | length 51.6
  Top Layer w0.05: 1.U12@151.142,103.518 v4(151.542,103.118)
  Top Layer w0.1: v1(186.893,92.354) 186.909,92.354 187.102,92.547 188.116,92.547 188.284,92.379 189.164,92.379 189.289,92.254 IC3.6@189.564,92.254
  Layer 4 w0.1: v4@151.542,103.125 151.587,103.08 151.792,103.08 152.147,102.725 155.36,102.725 156.268,103.632 163.571,103.632 166.497,100.706 166.497,92.48 170.932,88.045 174.868,88.045 ; 176.021,87.479 181.255,87.479 186.324,92.547 186.685,92.547 186.877,92.354 v1(186.893,92.354)
HDMI_TX2_P: 1.T12 IC3.5 R148.2 | length 53.6
  Top Layer w0.05: 1.T12@150.342,103.518 v4(150.742,103.918)
  Top Layer w0.1: v1(186.893,92.989) 186.909,92.989 187.102,92.797 188.219,92.797 188.387,92.629 189.164,92.629 189.289,92.754 IC3.5@189.564,92.754
  Layer 4 w0.1: v4@150.735,103.918 150.735,103.552 151.041,103.246 151.041,102.959 151.275,102.725 151.553,102.725 151.935,102.342 151.935,102.294 152.211,102.018 153.639,102.018 153.983,102.362 155.012,102.362 155.021,102.371 155.507,102.371 156.414,103.278 163.424,103.278 166.143,100.559 166.143,92.333 170.785,87.691 174.868,87.691 ; 176.021,87.729 181.152,87.729 186.22,92.797 186.685,92.797 186.877,92.989 v1(186.893,92.989)
HDMI_TX_5V0: F1.2 J6.18 R149.2 R153.1 R154.1 | length 21.6
  Top Layer w0.1: v1(188.011,98.628) R154.1@189.009,98.628 ; v1(194.564,87.757) 194.564,87.04 195.014,86.59 F1.2@195.326,86.59 195.482,86.746 J6.18@198.857,86.746
  Layer 4 w0.1: v1(191.814,97.873) 192.659,97.028 192.659,89.662 v1(194.564,87.757)
  Layer 3 w0.1: v1(188.011,98.628) 191.059,98.628 v1(191.814,97.873)
HDMI_TX_CEC: 1.T15 D2.1 IC3.15 | length 55.1
  Top Layer w0.05: v4(149.942,106.318) 1.T15@150.342,105.918
  Top Layer w0.1: v1(179.4,90.576) 179.4,89.306 183.566,85.14 D2.1@186.639,85.14 186.639,85.674 187.706,86.741 187.706,86.995 188.465,87.754 IC3.15@189.564,87.754
  Layer 4 w0.131: v4@149.942,106.311 150.32,105.934 154.797,105.934 154.94,105.791 164.465,105.791 168.656,101.6 168.656,93.374 171.826,90.204 175.006,90.204 ; 176.098,90.576 v1(179.4,90.576)
HDMI_TX_CLK_N: 1.P19 IC3.13 R141.2 | length 63.6
  Top Layer w0.05: 1.P19@148.742,109.118 v4(149.142,108.718)
  Top Layer w0.1: v1(182.067,91.846) 182.067,91.83 182.26,91.638 182.26,90.818 183.211,89.866 183.973,89.104 187.76,89.104 187.985,88.879 189.164,88.879 189.289,88.754 IC3.13@189.564,88.754
  Layer 4 w0.1: v4@149.142,108.725 149.142,109.096 149.479,109.433 149.479,110.871 151.892,113.284 173.309,113.284 183.95,102.643 183.95,97.971 183.261,97.282 183.261,94.9 182.194,93.833 182.194,92.055 182.067,91.928 v1(182.067,91.846)
HDMI_TX_CLK_P: 1.N18 IC3.12 R142.2 | length 64.4
  Top Layer w0.05: 1.N18@147.942,108.318 v4(148.342,108.718)
  Top Layer w0.1: v1(182.702,91.846) 182.702,91.83 182.51,91.638 182.51,90.921 183.388,90.043 184.077,89.354 187.863,89.354 188.088,89.129 189.164,89.129 189.289,89.254 IC3.12@189.564,89.254
  Layer 4 w0.1: v4@148.335,108.718 148.717,109.1 148.717,110.744 151.638,113.665 171.729,113.665 171.91,113.484 173.392,113.484 184.15,102.726 184.15,97.632 183.642,97.124 183.642,94.742 182.575,93.675 182.575,92.055 182.702,91.928 v1(182.702,91.846)
HDMI_TX_HPD: 1.T14 R138.2 U17.4 | length 45.7
  Top Layer w0.05: 1.T14@150.342,105.118 v4(150.742,105.518)
  Top Layer w0.1: v1(180.543,90.195) 182.659,88.08 R138.2@183.261,88.08 184.168,88.08 U17.4@184.191,88.102
  Layer 4 w0.131: v4@150.735,105.518 151.097,105.156 154.686,105.156 154.982,105.452 164.325,105.452 168.317,101.46 168.317,93.234 171.686,89.865 174.868,89.865 ; 175.905,89.56 179.908,89.56 v1(180.543,90.195)
HDMI_TX_HPD_LS: IC3.14 R139.1 U17.3 | length 3.6
  Top Layer w0.1: U17.3@186.091,88.102 186.113,88.08 R139.1@186.944,88.08 188.156,88.08 188.33,88.254 IC3.14@189.564,88.254
HDMI_TX_SCL: 1.V20 IC4.3 R151.2 | length 43.7
  Top Layer w0.05: 1.V20@151.942,109.918 v4(152.342,110.318)
  Top Layer w0.1: v1(183.051,101.353) R151.2@188.951,101.353 190.318,101.353 190.483,101.188 IC4.3@190.483,101.098
  Layer 4 w0.131: v4@152.335,110.318 152.371,110.353 152.371,110.715 153.035,111.379 172.212,111.379 182.238,101.353 v1(183.051,101.353)
HDMI_TX_SCL_LS: IC3.3 IC4.6 R153.2 | length 11.1
  Top Layer w0.1: IC3.3@189.564,93.754 187.932,93.754 186.817,94.869 186.817,95.885 187.96,97.028 189.865,97.028 190.914,98.077 R153.2@190.914,98.628 190.983,98.697 IC4.6@190.983,99.898
HDMI_TX_SDA: 1.W20 IC4.4 R152.2 | length 42.4
  Top Layer w0.05: 1.W20@152.742,109.918 v4(153.142,110.318)
  Top Layer w0.1: v1(183.007,100.457) 188.932,100.457 188.974,100.498 IC4.4@190.383,100.498
  Layer 4 w0.131: v4@153.135,110.318 153.688,110.871 171.653,110.871 182.067,100.457 v1(183.007,100.457)
HDMI_TX_SDA_LS: IC3.4 IC4.5 R154.2 | length 12.2
  Top Layer w0.1: IC3.4@189.564,93.254 187.543,93.254 186.055,94.742 186.055,96.139 187.579,97.663 189.357,97.663 189.909,98.215 R154.2@189.909,98.628 189.909,99.234 190.483,99.808 IC4.5@190.483,99.898
HDMIBUF_CLK_N: IC3.31 L1.4 | length 3
  Top Layer w0.1: IC3.31@193.164,91.254 193.439,91.254 193.564,91.379 193.896,91.379 193.955,91.321 193.955,91.287 194.652,90.59 195.121,90.121 195.327,90.121 195.344,90.104 195.519,90.104 L1.4@195.559,90.064
HDMIBUF_CLK_P: IC3.32 L1.3 | length 3
  Top Layer w0.1: IC3.32@193.164,91.754 193.439,91.754 193.564,91.629 194,91.629 194.205,91.424 194.205,91.391 194.741,90.855 195.224,90.371 195.327,90.371 195.344,90.389 195.519,90.389 L1.3@195.559,90.429
HDMIBUF_D0_N: IC3.33 L2.4 | length 2.8
  Top Layer w0.1: IC3.33@193.164,92.254 193.439,92.254 193.564,92.379 194.26,92.379 194.652,91.987 194.994,91.645 195.327,91.645 195.344,91.628 195.519,91.628 L2.4@195.559,91.588
HDMIBUF_D0_P: IC3.34 L2.3 | length 2.8
  Top Layer w0.1: IC3.34@193.164,92.754 193.439,92.754 193.564,92.629 194.363,92.629 194.741,92.252 195.097,91.895 195.327,91.895 195.344,91.913 195.519,91.913 L2.3@195.559,91.953
HDMIBUF_D1_N: IC3.35 L3.4 | length 2.6
  Top Layer w0.1: IC3.35@193.164,93.254 193.439,93.254 193.564,93.379 194.09,93.379 194.3,93.169 195.327,93.169 195.344,93.152 195.519,93.152 L3.4@195.559,93.112
HDMIBUF_D1_P: IC3.36 L3.3 | length 2.6
  Top Layer w0.1: IC3.36@193.164,93.754 193.439,93.754 193.564,93.629 194.194,93.629 194.404,93.419 195.327,93.419 195.344,93.437 195.519,93.437 L3.3@195.559,93.477
HDMIBUF_D2_N: IC3.37 L4.4 | length 2.6
  Top Layer w0.1: IC3.37@193.164,94.254 193.439,94.254 193.564,94.379 194.428,94.379 194.742,94.693 195.327,94.693 195.344,94.676 195.519,94.676 L4.4@195.559,94.636
HDMIBUF_D2_P: IC3.38 L4.3 | length 2.6
  Top Layer w0.1: IC3.38@193.164,94.754 193.439,94.754 193.564,94.629 194.324,94.629 194.638,94.943 195.327,94.943 195.344,94.961 195.519,94.961 L4.3@195.559,95.001
HDMICON_CEC: IC3.18 J6.13 | length 17
  Top Layer w0.1: IC3.18@190.614,86.304 190.614,85.23 191.008,84.836 196.85,84.836 197.612,85.598 200.406,85.598 200.914,86.106 200.914,88.773 200.441,89.246 J6.13@198.857,89.246
HDMICON_CLK_N: J6.12 L1.1 | length 2.9
  Top Layer w0.1: L1.1@196.059,90.064 196.769,90.064 197.086,89.746 J6.12@198.857,89.746
HDMICON_CLK_P: J6.10 L1.2 | length 2.9
  Top Layer w0.1: L1.2@196.059,90.429 196.769,90.429 197.086,90.746 J6.10@198.857,90.746
HDMICON_D0_N: J6.9 L2.1 | length 2.9
  Top Layer w0.1: L2.1@196.059,91.588 196.757,91.588 197.098,91.246 J6.9@198.857,91.246
HDMICON_D0_P: J6.7 L2.2 | length 2.9
  Top Layer w0.1: L2.2@196.059,91.953 196.781,91.953 197.074,92.246 J6.7@198.857,92.246
HDMICON_D1_N: J6.6 L3.1 | length 2.9
  Top Layer w0.1: L3.1@196.059,93.112 196.745,93.112 197.11,92.746 J6.6@198.857,92.746
HDMICON_D1_P: J6.4 L3.2 | length 2.9
  Top Layer w0.1: L3.2@196.059,93.477 196.793,93.477 197.062,93.746 J6.4@198.857,93.746
HDMICON_D2_N: J6.3 L4.1 | length 3
  Top Layer w0.1: L4.1@196.059,94.636 196.733,94.636 197.122,94.246 J6.3@198.857,94.246
HDMICON_D2_P: J6.1 L4.2 | length 2.9
  Top Layer w0.1: L4.2@196.059,95.001 196.805,95.001 197.05,95.246 J6.1@198.857,95.246
HDMICON_HPD: IC3.19 J6.19 | length 9.5
  Top Layer w0.1: IC3.19@191.114,86.304 191.114,85.746 191.516,85.344 196.342,85.344 197.244,86.246 J6.19@199.492,86.246
HDMICON_SCL_LS: IC3.42 J6.15 | length 14.2
  Top Layer w0.1: v1(190.119,96.266) 190.614,95.771 IC3.42@190.614,95.204 ; v1(195.693,89.154) 196.52,89.154 197.428,88.246 J6.15@198.857,88.246
  Layer 3 w0.1: v1(190.119,96.266) 190.119,94.728 v1(195.693,89.154)
HDMICON_SDA_LS: IC3.41 J6.16 | length 15.2
  Top Layer w0.1: IC3.41@191.114,95.204 191.114,95.737 v1(191.643,96.266) ; v1(195.707,88.265) 196.226,87.746 J6.16@198.857,87.746
  Layer 3 w0.1: v1(191.643,96.266) 191.643,94.615 196.469,89.789 196.469,88.646 196.088,88.265 v1(195.707,88.265)
HPD_LED: DS9.1 R156.2 U18.4
ILIM: R306.1 R308.2 U28.17 | length 3.1
  Bottom Layer w0.1: R306.1@134.29,169.12 R308.2@135.179,169.12 135.179,168.427 135.965,167.641 U28.17@135.965,167.284
ILIM_FET_G: Q8.1 R307.1 R309.2 | length 2.3
  Bottom Layer w0.1: 130.411,173.634 130.411,172.61 Q8.1@130.673,172.348 ; R307.1@131.311,173.634 R309.2@132.189,173.634
ILIM_FET_S: Q8.3 R306.2 | length 2.8
  Bottom Layer w0.1: Q8.3@131.623,170.348 131.951,170.02 R306.2@134.29,170.02
INIT_B: 1.R10 R202.1 | length 15.9
  Top Layer w0.05: 1.R10@149.542,101.918 v5(149.942,102.318)
  Top Layer w0.1: v1(159.309,100.914) 159.309,101.651 161.671,104.013 R202.1@162.618,104.013
  Layer 6 w0.1: v5@149.935,102.318 150.36,102.743 154.686,102.743 154.813,102.616 157.607,102.616 v1(159.309,100.914)
JA1_N: P1.9 R259.1 U2.1 | length 17.5
  Top Layer w0.1: R259.1@199.078,102.743 199.291,102.956 199.291,102.992 199.362,103.063 200.571,103.063 202.053,104.544 202.053,107.338 202.875,108.161 204.526,108.161 204.89,108.524 204.89,109.433 204.948,109.491 P1.9@206.035,109.491
  Bottom Layer w0.1: U2.1@201.933,114.386 201.933,114.938 202.819,115.824 204.782,115.824 206.035,114.571
JA1_P: P1.3 R261.1 U2.2 | length 13.4
  Top Layer w0.1: R261.1@199.078,103.632 199.291,103.419 199.291,103.383 199.362,103.313 200.468,103.313 201.803,104.648 201.803,107.442 202.772,108.411 204.423,108.411 204.64,108.628 204.64,109.433 204.581,109.491 P1.3@203.495,109.491
  Bottom Layer w0.1: U2.2@201.933,113.736 202.659,113.736 203.495,114.571
JA1_R_N: 1.V18 C82.2 R259.2 | length 52.9
  Top Layer w0.05: 1.V18@151.942,108.318 v4(152.342,108.718)
  Top Layer w0.1: v1(174.6,105.359) 174.6,105.401 174.432,105.568 174.432,105.739 176.469,107.776 183.284,107.776 186.895,104.165 194.871,104.165 196.037,102.999 196.96,102.999 197.018,102.94 197.018,102.824 197.193,102.649 C82.2@197.231,102.649 197.259,102.677 198.112,102.677 R259.2@198.178,102.743
  Layer 4 w0.1: v4(152.342,108.718) 152.342,108.764 152.505,108.927 152.505,108.982 152.842,109.319 152.842,109.642 153.018,109.818 154.199,109.818 154.242,109.775 170.665,109.775 172.541,107.898 174.432,106.007 174.432,105.568 174.6,105.401 v1(174.6,105.359)
JA1_R_P: 1.V17 C82.1 R261.2 | length 53.2
  Top Layer w0.05: 1.V17@151.942,107.518 v4(152.342,107.918)
  Top Layer w0.1: v1(174.015,105.359) 174.015,105.401 174.182,105.568 174.182,105.843 176.366,108.026 183.388,108.026 184.427,106.987 184.506,106.909 186.999,104.415 194.974,104.415 195.339,104.051 195.428,103.962 196.141,103.249 196.96,103.249 197.018,103.308 197.018,103.424 197.193,103.599 C82.1@197.231,103.599 198.145,103.599 R261.2@198.178,103.632
  Layer 4 w0.1: v4(152.342,107.918) 152.399,107.975 152.399,108.228 152.755,108.584 152.755,108.878 152.982,109.105 153.953,109.105 154.242,109.394 154.242,109.466 154.301,109.525 170.561,109.525 172.276,107.81 174.182,105.903 174.182,105.568 174.015,105.401 v1(174.015,105.359)
JA2_N: P1.2 R260.1 U2.3 | length 16.4
  Top Layer w0.1: R260.1@199.078,105.537 199.291,105.324 199.291,105.288 199.362,105.217 199.551,105.217 200.664,106.33 200.664,107.926 201.061,108.323 201.061,109.593 202.461,110.994 204.466,110.994 204.64,111.168 204.64,111.973 204.581,112.031 P1.2@203.495,112.031
  Bottom Layer w0.1: U2.3@201.933,113.086 204.98,113.086 206.035,112.031
JA2_P: P1.8 R262.1 U2.4 | length 14
  Top Layer w0.1: R262.1@199.078,104.648 199.291,104.861 199.291,104.897 199.362,104.967 199.655,104.967 200.914,106.227 200.914,107.822 201.311,108.219 201.311,109.49 202.565,110.744 204.57,110.744 204.89,111.064 204.89,111.973 204.948,112.031 P1.8@206.035,112.031
  Bottom Layer w0.1: U2.4@201.933,112.436 202.698,112.436 203.102,112.031 203.495,112.031
JA2_R_N: 1.W19 C83.2 R260.2 | length 50
  Top Layer w0.05: 1.W19@152.742,109.118 v4(153.142,108.718)
  Top Layer w0.1: v1(172.466,106.451) 172.466,106.392 172.726,106.132 172.809,106.132 175.643,108.966 184.404,108.966 188.216,105.154 196.96,105.154 197.018,105.213 197.018,105.329 197.193,105.504 C83.2@197.231,105.504 198.145,105.504 R260.2@198.178,105.537
  Layer 4 w0.1: v4(153.142,108.718) 153.442,108.418 154.066,108.418 154.116,108.468 169.715,108.468 172.051,106.132 172.146,106.132 v1(172.466,106.451)
JA2_R_P: 1.W18 C83.1 R262.2 | length 50
  Top Layer w0.05: 1.W18@152.742,108.318 v4(153.142,107.918)
  Top Layer w0.1: v1(172.466,105.562) 172.466,105.622 172.726,105.882 172.912,105.882 175.747,108.716 184.3,108.716 186.005,107.011 188.112,104.904 196.96,104.904 197.018,104.845 197.018,104.729 197.193,104.554 C83.1@197.231,104.554 197.259,104.582 198.112,104.582 R262.2@198.178,104.648
  Layer 4 w0.1: v4(153.142,107.918) 153.442,108.218 169.611,108.218 171.947,105.882 172.147,105.882 v1(172.466,105.562)